# Altium PCB bdcmc25_revised.PcbDoc (part 4 of 4)
Units mil, origin at the board's own origin, x right, y up, seen from the top; angles counter-clockwise.
Board outline 7000 x 2750 mil, 4 copper layers (Top Layer, Layer 2 (GND), Layer 3 (GND), Bottom Layer), stack 23.756 mil thick; 347 components, 158 nets, 1046 pads, 1117 vias.
Unrouted connection lines stored in the file: 6.
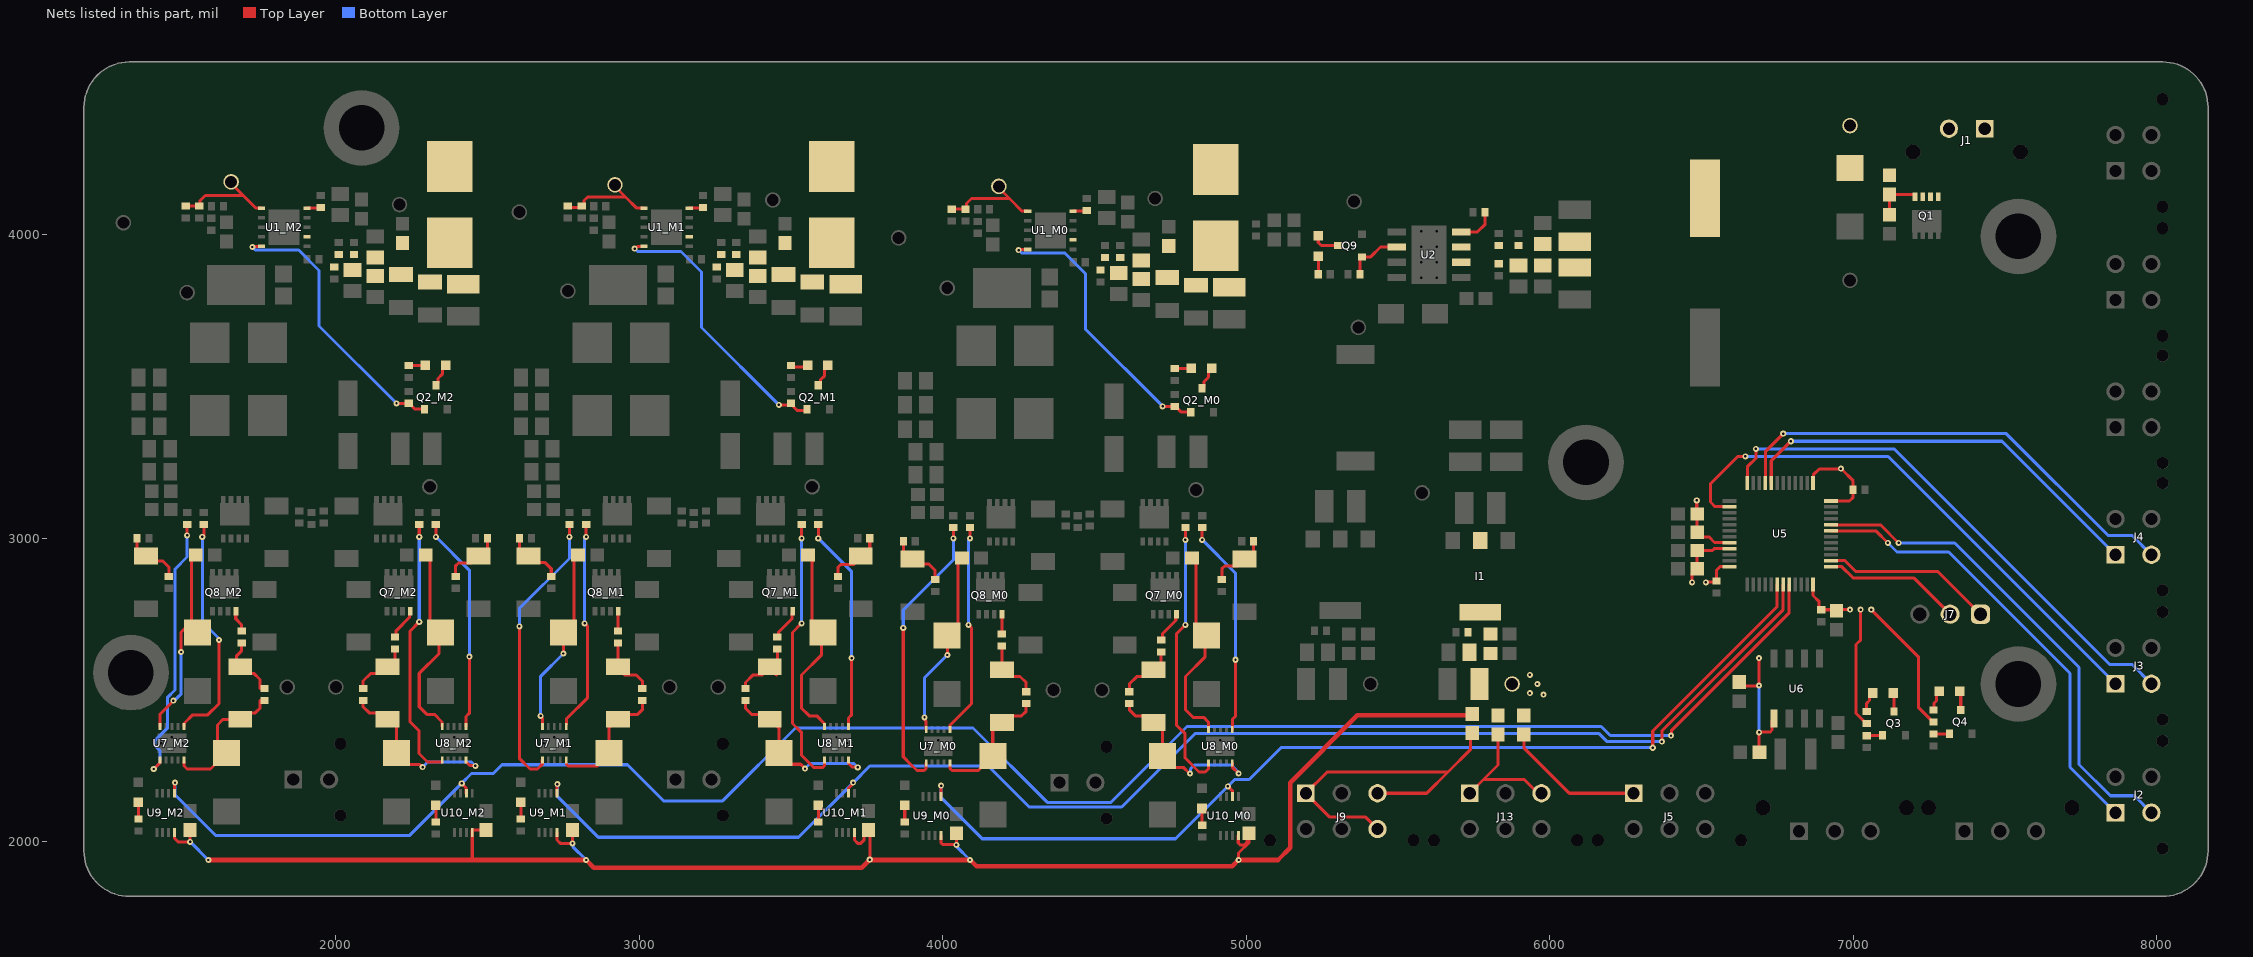
[diagram p5: the nets of this part, all layers, seen from the top]

## Via types
v1: diameter 20, hole 8, Top Layer to Bottom Layer, 1102 vias
v2: diameter 20, hole 7.87, Top Layer to Bottom Layer, 15 vias

## Nets (pads, with @x,y where several pads share a name; then routed paths per layer and width w, separated by ;. In a path a pad name is that pad's centre, name@x,y a point inside that pad or via, vN(x,y) a via of type N, cw(c..) or ccw(c..) an arc to the next point about the centre after c; other vN are vias at no path point) (continued)
NetC60_M0_2: C60_M0.2 D13_M0.1 U7_M0.5 | length 620.6
  Top Layer w10: v1(3940,2410) 3941.15,2408.85 3941.15,2401.41 3945.63,2396.93 U7_M0.5@3945.63,2370.12 ; v1(4015.26,2615.47) 4015.26,2679.86 D13_M0.1@4015,2680.12 4050,2715.12 4050,2925 4053.5,2925 C60_M0.2@4063.5,2935
  Bottom Layer w10: v1(3940,2410) 3940,2540.21 v1(4015.26,2615.47)
NetC60_M1_2: C60_M1.2 D13_M1.1 U7_M1.5 | length 617.3
  Top Layer w10: v1@2676.15,2413.85 v1(2675,2415) 2675,2413.38 2680.63,2407.75 U7_M1.5@2680.63,2380.12 ; v1(2750.26,2620.47) 2750.26,2684.86 2750,2685.12 2785,2720.12 2785,2930 2788.5,2930 C60_M1.2@2798.5,2940
  Bottom Layer w10: v1(2675,2415) 2675,2545.21 v1(2750.26,2620.47)
NetC60_M2_2: C60_M2.2 D13_M2.1 U7_M2.5 | length 618
  Top Layer w10: U7_M2.5@1420.63,2380.12 1420.63,2420.63 v1(1465,2465) ; v1(1490.26,2625.47) 1490.26,2689.86 1490,2690.12 1525,2725.12 1525,2935 1528.5,2935 C60_M2.2@1538.5,2945
  Bottom Layer w10: v1(1465,2465) 1467.71,2465 1482.52,2479.81 1483.19,2479.81 1490.26,2486.88 v1(1490.26,2625.47)
NetC61_M0_2: C61_M0.2 D14_M0.1 U8_M0.5 | length 669
  Top Layer w10: C61_M0.2@4821.5,2935 4835,2921.5 C61_M0.2@4835,2920 ; C61_M0.2@4837.48,2918.35 4835.83,2920 C61_M0.2@4835,2920 ; U8_M0.5@4875.63,2370.12 4875.63,2394.37 4860,2410 4825,2410 4800,2435 4800,2545 4865,2610 4865,2675 4870,2680 D14_M0.1@4870,2680.12 4835,2715.12 C61_M0.2@4835,2920
NetC61_M1_2: C61_M1.2 D14_M1.1 U8_M1.5 | length 663.1
  Top Layer w10: C61_M1.2@3556.5,2940 3570,2926.5 C61_M1.2@3570,2925 ; 3572.48,2923.35 3570.83,2925 C61_M1.2@3570,2925 ; U8_M1.5@3610.63,2375.12 3610.63,2381.65 3610,2382.28 3610,2390 3585,2415 3560,2415 3535,2440 3535,2550 3600,2615 3600,2680 3605,2685 3605,2685.12 3570,2720.12 C61_M1.2@3570,2925
NetC61_M2_2: C61_M2.2 D14_M2.1 U8_M2.5 | length 663.1
  Top Layer w10: C61_M2.2@2296.5,2945 2310,2931.5 C61_M2.2@2310,2930 ; C61_M2.2@2312.48,2928.35 2310.83,2930 C61_M2.2@2310,2930 ; U8_M2.5@2350.63,2380.12 2350.63,2386.65 2350,2387.28 2350,2395 2325,2420 2300,2420 2275,2445 2275,2555 2340,2620 2340,2685 2345,2690 D14_M2.1@2345,2690.12 2310,2725.12 C61_M2.2@2310,2930
NetC62_M0_2: C62_M0.2 U7_M0.6 | length 939
  Top Layer w10: v1(3870,2705) 3870,2280 3894.09,2255.91 3915,2235 3939.14,2235 3945.35,2241.21 3945.35,2259.61 U7_M0.6@3945.63,2259.88 ; v1(4035,3000) C62_M0.2@4035,3035.32
  Bottom Layer w10: v1(3870,2705) 3870,2763.63 4035,2928.63 v1(4035,3000)
NetC62_M1_2: C62_M1.2 U7_M1.6 | length 944.5
  Top Layer w10: v1(2605,2710) 2605,2275 2640,2240 2665,2240 2680.35,2255.35 2680.35,2269.61 U7_M1.6@2680.63,2269.88 ; v1(2770,3005) C62_M1.2@2770,3040.32
  Bottom Layer w10: v1(2605,2710) 2605,2768.63 2770,2933.63 v1(2770,3005)
NetC62_M2_2: C62_M2.2 U7_M2.6 | length 902.7
  Top Layer w10: v1(1400,2240) 1420.63,2260.63 U7_M2.6@1420.63,2269.88 ; v1(1510,3010) C62_M2.2@1510,3045.32
  Bottom Layer w10: v1(1400,2240) 1420,2260 1420,2301.04 1403.82,2317.22 1403.82,2332.78 1445,2373.96 1445,2475 1470,2500 1470,2898.63 1510,2938.63 v1(1510,3010)
NetC63_M0_1: C63_M0.1 U8_M0.6 | length 903.1
  Top Layer w10: v1(4800,2715) 4770,2685 4770,2385 4799.04,2355.96 4799.04,2275.96 4845,2230 4865,2230 4875.63,2240.63 U8_M0.6@4875.63,2259.88 ; v1(4800,2995) C63_M0.1@4800,3035.32
  Bottom Layer w10: v1(4800,2715) v1(4800,2995)
NetC63_M1_1: C63_M1.1 U8_M1.6 | length 893.8
  Top Layer w10: v1(3535,2720) 3505,2690 3505,2390 3534.04,2360.96 3534.04,2285.96 3575,2245 3604.77,2245 3610.63,2250.86 U8_M1.6@3610.63,2269.88 ; v1(3535,3000) C63_M1.1@3535,3040.32
  Bottom Layer w10: v1(3535,2720) v1(3535,3000)
NetC63_M2_1: C63_M2.1 U8_M2.6 | length 866.7
  Top Layer w10: v1(2275,2725) 2245,2695 2245,2395 2274.04,2365.96 2274.04,2290.96 2301.93,2263.07 U8_M2.6@2350.35,2263.07 ; v1(2275,3005) C63_M2.1@2275,3045.32
  Bottom Layer w10: v1(2275,2725) v1(2275,3005)
NetD2_M0_1: D2_M0.1 R3_M0.1 | length 55.2
  Top Layer w10: R3_M0.1@4765,3559.37 4818.75,3559.37 D2_M0.1@4819.81,3560.43
NetD2_M0_2: D2_M0.2 Q2_M0.3 | length 79.2
  Top Layer w10: Q2_M0.3@4855,3494.37 4861.81,3501.18 4861.81,3516.81 4876.06,3531.06 4876.06,3549.68 D2_M0.2@4886.81,3560.43
NetD2_M1_1: D2_M1.1 R3_M1.1 | length 55.2
  Top Layer w10: R3_M1.1@3500,3564.37 3553.75,3564.37 D2_M1.1@3554.8,3565.43
NetD2_M1_2: D2_M1.2 Q2_M1.3 | length 79.2
  Top Layer w10: Q2_M1.3@3590,3499.37 3596.81,3506.18 3596.81,3521.81 3611.06,3536.06 3611.06,3554.68 D2_M1.2@3621.8,3565.43
NetD2_M2_1: D2_M2.1 R3_M2.1 | length 55.2
  Top Layer w10: R3_M2.1@2240,3569.37 2293.75,3569.37 D2_M2.1@2294.8,3570.43
NetD2_M2_2: D2_M2.2 Q2_M2.3 | length 79.2
  Top Layer w10: Q2_M2.3@2330,3504.37 2336.81,3511.18 2336.81,3526.81 2351.06,3541.06 2351.06,3559.68 D2_M2.2@2361.8,3570.43
NetD4_1: D4.1 R18.1 | length 68.9
  Top Layer w10: R18.1@7045,2429.68 7045,2456.5 7054.06,2465.55 7054.06,2479.68 D4.1@7064.81,2490.43
NetD4_2: D4.2 Q3.3 | length 75.6
  Top Layer w10: D4.2@7122.43,2481.05 D4.2@7131.81,2490.43 7135,2487.23 Q3.3@7135,2429.37
NetD5_1: D5.1 R19.1 | length 68.9
  Top Layer w10: R19.1@7265,2434.68 7266.97,2436.65 7266.97,2456.97 7275,2465 7275,2485.62 D5.1@7284.81,2495.43
NetD5_2: D5.2 Q4.3 | length 62.4
  Top Layer w10: D5.2@7351.81,2495.43 7355,2492.23 Q4.3@7355,2434.37
NetD6_M0_1: D6_M0.1 R22_M0.2 R23_M0.1 | length 195.3
  Top Layer w10: R23_M0.1@3870.32,2990 3870.32,2954.17 3892.87,2931.61 D6_M0.1@3900,2931.61 3916.61,2915 3955,2915 3975,2895 R22_M0.2@3975,2864.68
NetD6_M1_1: D6_M1.1 R22_M1.2 R23_M1.1 | length 195.3
  Top Layer w10: R23_M1.1@2605.32,2995 2605.32,2959.17 2627.87,2936.61 2635,2936.61 2651.61,2920 2690,2920 2710,2900 R22_M1.2@2710,2869.68
NetD6_M2_1: D6_M2.1 R22_M2.2 R23_M2.1 | length 195.3
  Top Layer w10: R23_M2.1@1345.32,3000 1345.32,2964.17 1367.87,2941.61 D6_M2.1@1375,2941.61 1391.61,2925 1430,2925 1450,2905 R22_M2.2@1450,2874.68
NetD7_M0_1: D7_M0.1 R24_M0.2 R25_M0.2 | length 198.3
  Top Layer w10: R25_M0.2@4920,2864.68 4920,2900 4929.06,2909.06 4972.44,2909.06 D7_M0.1@4995,2931.61 5002.13,2931.61 5024.69,2954.17 R24_M0.2@5024.69,2990
NetD7_M1_1: D7_M1.1 R24_M1.2 R25_M1.2 | length 198.3
  Top Layer w10: R25_M1.2@3655,2869.68 3655,2905 3664.06,2914.06 3707.44,2914.06 3730,2936.61 3737.13,2936.61 3759.68,2959.17 R24_M1.2@3759.68,2995
NetD7_M2_1: D7_M2.1 R24_M2.2 R25_M2.2 | length 198.3
  Top Layer w10: R25_M2.2@2395,2874.68 2395,2910 2404.06,2919.06 2447.44,2919.06 D7_M2.1@2470,2941.61 2477.13,2941.61 2499.68,2964.17 R24_M2.2@2499.68,3000
NetD10_M0_1: D10_M0.1 R28_M0.2 R30_M0.1 | length 206.3
  Top Layer w10: R30_M0.1@4195,2645.32 D10_M0.1@4195,2566.61 4216.61,2545 4255,2545 4275,2525 R28_M0.2@4275,2494.68
NetD10_M0_2: D10_M0.2 D12_M0.2 R28_M0.1 U7_M0.10 | length 423.8
  Top Layer w10: U7_M0.10@4024.65,2253.07 4024.65,2240.86 4030.5,2235 4117.2,2235 4125.51,2243.31 4125.51,2245.28 4163.03,2282.8 D12_M0.2@4165,2282.8 4165,2370.83 4187.56,2393.39 D10_M0.2@4195,2393.39 4216.61,2415 4260,2415 4275,2430 R28_M0.1@4275,2455.32
NetD10_M1_1: D10_M1.1 R28_M1.2 R30_M1.1 | length 206.3
  Top Layer w10: R30_M1.1@2930,2650.32 2930,2571.61 2951.61,2550 2990,2550 3010,2530 R28_M1.2@3010,2499.68
NetD10_M1_2: D10_M1.2 D12_M1.2 R28_M1.1 U7_M1.10 | length 408.1
  Top Layer w10: U7_M1.10@2759.65,2258.07 2759.65,2256.13 2765.5,2250.28 2862.48,2250.28 2900,2287.8 2900,2375.83 2922.56,2398.39 2930,2398.39 2951.61,2420 2995,2420 3010,2435 R28_M1.1@3010,2460.32
NetD10_M2_1: D10_M2.1 R28_M2.2 R30_M2.1 | length 214.5
  Top Layer w10: R30_M2.1@1690,2655.32 1690,2630 1673.32,2613.32 1673.32,2579.93 1670,2576.61 1691.61,2555 1730,2555 1750,2535 1750,2504.68
NetD10_M2_2: D10_M2.2 D12_M2.2 R28_M2.1 U7_M2.10 | length 473.1
  Top Layer w10: U7_M2.10@1499.65,2263.07 1499.65,2250.35 1510,2240 1587.2,2240 1600.51,2253.31 1600.51,2255.28 1638.03,2292.8 D12_M2.2@1640,2292.8 1610,2322.8 1610,2385 1628.39,2403.39 1670,2403.39 1691.61,2425 1735,2425 1750,2440 1750,2465.32
NetD11_M0_1: D11_M0.1 R29_M0.2 R31_M0.2 | length 225.7
  Top Layer w10: R29_M0.2@4615,2494.68 4615,2520 4639.06,2544.06 4669.06,2544.06 4675,2550 4678.39,2550 D11_M0.1@4695,2566.61 ; D11_M0.1@4716.61,2545 D11_M0.1@4695,2566.61 ; R31_M0.2@4720,2625.32 4720,2589.17 4697.44,2566.61 D11_M0.1@4695,2566.61
NetD11_M0_2: D11_M0.2 D15_M0.2 R29_M0.1 U8_M0.10 | length 563.2
  Top Layer w10: R29_M0.1@4615,2455.32 4615,2435 4635,2415 4673.39,2415 D11_M0.2@4695,2393.39 D11_M0.2@4702.44,2393.39 ; D11_M0.2@4725,2370.83 D15_M0.2@4725,2282.8 4762.52,2245.28 4792.85,2245.28 4813.12,2225 v1(4815,2225) ; U8_M0.10@4954.37,2259.88 4954.37,2245.63 v1(4975,2225)
  Bottom Layer w10: v1(4815,2225) 4816.91,2226.91 4816.91,2240.49 4829.43,2253 4949.83,2253 4962.27,2240.56 4962.27,2240.43 4975,2227.71 v1(4975,2225)
NetD11_M1_1: D11_M1.1 R29_M1.2 R31_M1.2 | length 225.7
  Top Layer w10: R29_M1.2@3350,2499.68 3350,2525 3374.06,2549.06 3404.06,2549.06 3410,2555 3413.39,2555 D11_M1.1@3430,2571.61 ; D11_M1.1@3451.61,2550 D11_M1.1@3430,2571.61 ; R31_M1.2@3455,2630.32 3455,2594.17 3432.44,2571.61 D11_M1.1@3430,2571.61
NetD11_M1_2: D11_M1.2 D15_M1.2 R29_M1.1 U8_M1.10 | length 569.4
  Top Layer w10: R29_M1.1@3350,2460.32 3350,2440 3370,2420 3408.39,2420 3430,2398.39 3437.44,2398.39 3460,2375.83 D15_M1.2@3460,2292.8 3497.27,2255.52 3531.97,2255.52 v1(3546.25,2241.25) ; U8_M1.10@3689.65,2258.07 3701.57,2246.15 3718.85,2246.15 v1(3720,2245)
  Bottom Layer w10: v1(3546.25,2241.25) 3563,2258 3707,2258 v1(3720,2245)
NetD11_M2_1: D11_M2.1 R29_M2.2 R31_M2.2 | length 225.7
  Top Layer w10: R29_M2.2@2090,2504.68 2090,2530 2114.06,2554.06 2144.06,2554.06 2150,2560 2153.39,2560 D11_M2.1@2170,2576.61 ; D11_M2.1@2191.61,2555 D11_M2.1@2170,2576.61 ; R31_M2.2@2195,2635.32 2195,2599.17 2172.44,2576.61 D11_M2.1@2170,2576.61
NetD11_M2_2: D11_M2.2 D15_M2.2 R29_M2.1 U8_M2.10 | length 572.3
  Top Layer w10: R29_M2.1@2090,2465.32 2090,2445 2110,2425 2148.39,2425 D11_M2.2@2170,2403.39 2177.44,2403.39 2200,2380.83 D15_M2.2@2200,2292.8 2237.52,2255.28 2275.59,2255.28 2284.62,2246.25 v1(2286.25,2246.25) ; U8_M2.10@2429.65,2263.07 2441.57,2251.15 2458.85,2251.15 v1(2460,2250)
  Bottom Layer w10: v1(2286.25,2246.25) 2303,2263 2447,2263 v1(2460,2250)
NetD18_M0_1: D18_M0.1 R32_M0.2 | length 55.3
  Top Layer w10: D18_M0.1@3874.57,2119.8 3875,2119.38 R32_M0.2@3875,2064.68
NetD18_M1_1: D18_M1.1 R32_M1.2 | length 55.3
  Top Layer w10: D18_M1.1@2609.57,2124.8 2610,2124.38 R32_M1.2@2610,2069.68
NetD18_M2_1: D18_M2.1 R32_M2.2 | length 55.3
  Top Layer w10: D18_M2.1@1349.58,2129.8 1350,2129.38 R32_M2.2@1350,2074.68
NetD19_M0_1: D19_M0.1 R33_M0.2 | length 55.3
  Top Layer w10: D19_M0.1@4854.57,2109.8 4855,2109.38 R33_M0.2@4855,2054.68
NetD19_M1_1: D19_M1.1 R33_M1.2 | length 55.3
  Top Layer w10: D19_M1.1@3589.57,2114.8 3590,2114.38 R33_M1.2@3590,2059.68
NetD19_M2_1: D19_M2.1 R33_M2.2 | length 55.3
  Top Layer w10: D19_M2.1@2329.57,2119.8 2330,2119.38 R33_M2.2@2330,2064.68
NetD21_1: D21.1 R34.1 | length 60.1
  Top Layer w10: D21.1@5237.16,3929.8 5237.9,3929.07 R34.1@5237.9,3870
NetD21_2: D21.2 Q9.3 | length 91.8
  Top Layer w10: D21.2@5237.16,3996.8 5237.59,3996.38 5237.59,3975 5247.59,3965 Q9.3@5303.22,3965
NetF2_2: F2.2 J5.1 | length 467.5
  Top Layer w10: F2.2@5915,2353.5 5915,2310 6065,2160 J5.1@6276.89,2160
NetF3_2: F3.2 J9.1 J9.3 J9.6 | length 1197.7
  Top Layer w10: J9.6@5433.11,2041.89 5393.99,2081.01 5275.88,2081.01 J9.1@5196.89,2160 5266.89,2230 5665,2230 ; J9.3@5433.11,2160 5595,2160 5665,2230 ; F3.2@5740,2353.5 5740,2305 5665,2230
NetF4_2: F4.2 J13.1 J13.3 | length 433.4
  Top Layer w10: J13.1@5736.89,2160 5781.89,2205 ; F4.2@5830,2345 5830,2253.11 5781.89,2205 ; J13.3@5973.11,2160 5961.72,2160 5916.72,2205 5781.89,2205
NetJ1_1: J1.1@7434.06,4350 Q1.2
NetQ1_1: Q1.1 R1.2 R2.1 | length 157.6
  Top Layer w10: R2.1@7120,4066.5 R1.2@7120,4133.5 7201.41,4133.5 7204.29,4130.63 Q1.1@7204.29,4125.47
NetQ3_1: Q3.1 R16.1 | length 56.3
  Top Layer w10: R16.1@7042.66,2352.03 R16.1@7045,2349.68 7045.47,2350.16 7097.13,2350.16 Q3.1@7097.6,2350.63
NetQ4_1: Q4.1 R17.1 | length 56.3
  Top Layer w10: R17.1@7262.66,2357.03 R17.1@7265,2354.68 7265.47,2355.16 7317.13,2355.16 Q4.1@7317.6,2355.63
NetQ7_M0_1: Q7_M0.1 R31_M0.1 | length 100.1
  Top Layer w10: R31_M0.1@4724.1,2668.78 4724.1,2685.64 4767.99,2729.54 4767.99,2746.81 Q7_M0.1@4770.71,2749.53
NetQ7_M1_1: Q7_M1.1 R31_M1.1 | length 105.9
  Top Layer w10: R31_M1.1@3455,2669.68 3459.1,2673.78 3459.1,2690.64 3502.99,2734.54 3502.99,2751.81 Q7_M1.1@3505.71,2754.53
NetQ7_M2_1: Q7_M2.1 R31_M2.1 | length 105.9
  Top Layer w10: R31_M2.1@2195,2674.68 2199.1,2678.78 2199.1,2695.64 2242.99,2739.54 2242.99,2756.81 Q7_M2.1@2245.71,2759.53
NetQ8_M0_1: Q8_M0.1 R30_M0.2 | length 65.1
  Top Layer w10: R30_M0.2@4195,2684.68 4195.36,2685.04 4195.36,2749.17 Q8_M0.1@4195.71,2749.53
NetQ8_M1_1: Q8_M1.1 R30_M1.2 | length 65.1
  Top Layer w10: R30_M1.2@2930,2689.68 2930.36,2690.04 2930.36,2754.17 Q8_M1.1@2930.71,2754.53
NetQ8_M2_1: Q8_M2.1 R30_M2.2 | length 73.1
  Top Layer w10: Q8_M2.1@1670.71,2759.53 1670.36,2759.17 1670.36,2734.64 1689.36,2715.64 1689.36,2695.32 R30_M2.2@1690,2694.68
NetR7_M0_1: FB_M0.1 R7_M0.1 R10_M0.2 U1_M0.6 | length 337.5
  Top Layer w10: R7_M0.1@4035,4084.68 R10_M0.2@4080,4084.68 ; R10_M0.2@4078.24,4091.5 4078.24,4103.24 4095,4120 4220,4120 ; FB_M0.1@4185,4160 4185,4155 4220,4120 ; U1_M0.6@4280.2,4077.99 4279.83,4078.36 4261.64,4078.36 4220,4120
NetR7_M1_1: FB_M1.1 R7_M1.1 R10_M1.2 U1_M1.6 | length 334.5
  Top Layer w10: R7_M1.1@2770,4089.68 R10_M1.2@2810,4089.68 ; R10_M1.2@2810,4094.68 2811.43,4094.68 2818.24,4101.5 2818.24,4113.24 2830,4125 2955,4125 ; FB_M1.1@2920,4165 2920,4160 2955,4125 ; U1_M1.6@3015.2,4087.99 2992.01,4087.99 2955,4125
NetR7_M2_1: FB_M2.1 R7_M2.1 R10_M2.2 U1_M2.6 | length 344.6
  Top Layer w10: R7_M2.1@1510,4094.68 R10_M2.2@1550,4094.68 R10_M2.2@1555,4094.68 ; R10_M2.2@1553.24,4101.5 1553.24,4113.24 1570,4130 1695,4130 ; FB_M2.1@1655,4175 1655,4170 1695,4130 ; U1_M2.6@1755.2,4087.99 1754.83,4088.36 1736.64,4088.36 1695,4130
NetR9_M0_2: R9_M0.2 U1_M0.5 | length 46.2
  Top Layer w10: U1_M0.5@4429.8,4077.99 4430.71,4078.9 4473.58,4078.9 R9_M0.2@4475,4080.32
NetR9_M1_2: R9_M1.2 U1_M1.5 | length 46.2
  Top Layer w10: U1_M1.5@3164.8,4087.99 3207.68,4087.99 R9_M1.2@3210,4090.32
NetR9_M2_2: R9_M2.2 U1_M2.5 | length 46.2
  Top Layer w10: U1_M2.5@1904.8,4087.99 1905.71,4088.9 1948.58,4088.9 R9_M2.2@1950,4090.32
NetR12_2: R12.2 U2.4 | length 124.2
  Top Layer w10: U2.4@5708.89,4010 5762.59,4010 5787.59,4035 5787.59,4069.68 R12.2@5787.9,4070
NetR26_M0_1: R26_M0.1 U8_M0.1 | length 715.2
  Top Layer w10: v1(4855,2995) R26_M0.1@4855,3035.32 ; U8_M0.1@4954.37,2370.12 4954.37,2402.75 4965,2413.38 v1(4965,2600)
  Bottom Layer w10: v1(4855,2995) 4965,2885 v1(4965,2600)
NetR26_M1_1: R26_M1.1 U8_M1.1 | length 715.2
  Top Layer w10: v1(3590,3000) R26_M1.1@3590,3040.32 ; U8_M1.1@3689.37,2375.12 3689.37,2407.75 3700,2418.38 v1(3700,2605)
  Bottom Layer w10: v1(3590,3000) 3700,2890 v1(3700,2605)
NetR26_M2_1: R26_M2.1 U8_M2.1 | length 715.2
  Top Layer w10: v1(2330,3005) R26_M2.1@2330,3045.32 ; U8_M2.1@2429.37,2380.12 2429.37,2412.75 2440,2423.38 v1(2440,2610)
  Bottom Layer w10: v1(2330,3005) 2440,2895 v1(2440,2610)
NetR27_M0_1: R27_M0.1 U7_M0.1 | length 700.7
  Top Layer w10: U7_M0.1@4024.37,2370.12 4024.65,2370.39 4024.65,2384.65 4095,2455 4095,2705 v1(4085,2715) ; v1(4090,3000) R27_M0.1@4090,3035.32
  Bottom Layer w10: v1(4085,2715) 4085,2993.38 4090,2998.38 v1(4090,3000)
NetR27_M1_1: R27_M1.1 U7_M1.1 | length 688.7
  Top Layer w10: U7_M1.1@2759.65,2386.93 2759.65,2404.65 2830,2475 2830,2710 v1(2820,2720) ; v1(2825,3005) R27_M1.1@2825,3040.32
  Bottom Layer w10: v1(2820,2720) 2820,2998.38 2825,3003.38 v1(2825,3005)
NetR27_M2_1: R27_M2.1 U7_M2.1 | length 767.2
  Top Layer w10: U7_M2.1@1499.37,2380.12 1499.65,2380.39 1499.65,2389.65 1528.48,2418.48 1578.48,2418.48 1615,2455 v1(1615,2665) ; v1(1560,3005) 1565,3010 R27_M2.1@1565,3045.32
  Bottom Layer w10: v1(1560,3005) 1560,2740 1560,2725 1615,2670 v1(1615,2665)
PGOOD: Q9.1 R35.1 U2.6 | length 193.2
  Top Layer w10: R35.1@5375,3866.97 5375,3920.79 5381.81,3927.6 5410.19,3927.6 5442.59,3960 U2.6@5496.29,3960 U2.6@5494.99,3961.3
PGOOD_M0: Q2_M0.1 R5_M0.1 U1_M0.10 | length 926.9
  Top Layer w10: v1(4250,3950) 4251.62,3950 4253.63,3952.01 U1_M0.10@4280.2,3952.01 ; v1(4725,3435) R5_M0.1@4765,3435 4766.97,3435 4786.34,3415.63 Q2_M0.1@4817.6,3415.63
  Bottom Layer w10: v1(4250,3950) 4260,3940 4402.53,3940 4470,3872.53 4470,3690 v1(4725,3435)
PGOOD_M1: Q2_M1.1 R5_M1.1 U1_M1.10 | length 929
  Top Layer w10: v1(2985,3955) 2986.62,3955 2993.63,3962.01 U1_M1.10@3015.2,3962.01 ; v1(3460,3440) 3501.97,3440 3521.34,3420.63 Q2_M1.1@3552.6,3420.63
  Bottom Layer w10: v1(2985,3955) 2995,3945 3137.53,3945 3205,3877.53 3205,3695 v1(3460,3440)
PGOOD_M2: Q2_M2.1 R5_M2.1 U1_M2.10 | length 926.9
  Top Layer w10: v1(1725,3960) 1726.62,3960 1728.63,3962.01 U1_M2.10@1755.2,3962.01 ; v1(2200,3445) R5_M2.1@2240,3445 2241.97,3445 2261.34,3425.63 Q2_M2.1@2292.6,3425.63
  Bottom Layer w10: v1(1725,3960) 1735,3950 1877.53,3950 1945,3882.53 1945,3700 v1(2200,3445)
PWM_IN_M0: U5.30 U9_M0.1 U10_M0.2 | length 3346.8
  Top Layer w10: U9_M0.1@3994.06,2150 3994.13,2150.08 3994.13,2184.13 v1(3995,2185) ; v1(4940.07,2182.76) 4954.37,2168.46 U10_M0.2@4954.37,2150 ; v1(6340,2310) 6340,2365 6750.16,2775.16 U5.30@6750.16,2847.68
  Bottom Layer w10: v1(3995,2185) 3995,2145 4130,2010 4767.31,2010 4962.31,2205 5010,2205 5115,2310 v1(6340,2310)
PWM_IN_M1: U5.31 U9_M1.1 U10_M1.2 | length 4765.3
  Top Layer w10: U9_M1.1@2729.06,2155 2729.13,2155.08 2729.13,2189.13 v1(2730,2190) ; U10_M1.2@3689.37,2155 U10_M1.2@3689.37,2160 3689.61,2160.24 3689.61,2176.83 3705,2192.23 v1(3705,2195) ; v1(6370,2330) 6370,2365 6769.84,2764.84 U5.31@6769.84,2847.68
  Bottom Layer w10: v1(2730,2190) 2730,2150 2865,2015 3525,2015 v1(3705,2195) 3760,2250 4150,2250 4285,2115 4590,2115 4831.42,2356.42 6163.58,2356.42 6190,2330 v1(6370,2330)
PWM_IN_M2: U5.32 U9_M2.1 U10_M2.2 | length 6222
  Top Layer w10: U9_M2.1@1469.06,2160 1469.13,2160.08 1469.13,2194.13 v1(1470,2195) ; v1(2415.07,2192.76) 2429.37,2178.46 U10_M2.2@2429.37,2160 ; v1(6400,2350) 6401.15,2351.15 6401.15,2366.15 6789.53,2754.53 U5.32@6789.53,2847.68
  Bottom Layer w10: v1(1470,2195) 1470,2155 1605,2020 2242.31,2020 v1(2415.07,2192.76) 2447.31,2225 2518.95,2225 2547.79,2253.84 2961.16,2253.84 3080,2135 3275,2135 3515,2375 4100,2375 4345,2130 4555,2130 4805,2380 6170,2380 6200,2350 v1(6400,2350)
QUAD_0_A: J2.1@7865,2095.94 U5.43 | length 1503.5
  Top Layer w10: U5.43@6927.32,3024.84 7075.16,3024.84 v1(7115,2985)
  Bottom Layer w10: v1(7115,2985) 7145,2955 7315,2955 7715,2555 7715,2245.94 J2.1@7865,2095.94
QUAD_0_B: J2.3 U5.44 | length 1636.2
  Top Layer w10: U5.44@6927.32,3044.53 7090.47,3044.53 v1(7150,2985)
  Bottom Layer w10: v1(7150,2985) 7335,2985 7745,2575 7745,2255 7848.3,2151.7 7927.35,2151.7 J2.3@7983.11,2095.94
QUAD_1_A: J3.1@7865,2520.94 U5.14 | length 1812
  Top Layer w10: U5.14@6592.68,3103.58 6591.68,3104.58 6545.42,3104.58 6530,3120 6530,3180 6620,3270 v1(6645,3270)
  Bottom Layer w10: v1(6645,3270) 7115.94,3270 J3.1@7865,2520.94
QUAD_1_B: J3.3 U5.12 | length 1748.1
  Top Layer w10: U5.12@6651.73,3182.32 6651.73,3235.47 6680,3263.73 v1(6680,3295)
  Bottom Layer w10: v1(6680,3295) 7135,3295 7845,2585 7919.05,2585 J3.3@7983.11,2520.94
QUAD_2_A: J4.1@7865,2945.94 U5.8 | length 1389.3
  Top Layer w10: U5.8@6730.47,3182.32 6730.47,3255.47 v1(6795,3320)
  Bottom Layer w10: v1(6795,3320) 7490.94,3320 J4.1@7865,2945.94
QUAD_2_B: J4.3 U5.9 | length 1565.6
  Top Layer w10: U5.9@6710.79,3182.32 6710.79,3285.79 v1(6770,3345)
  Bottom Layer w10: v1(6770,3345) 7505,3345 7840,3010 7919.05,3010 J4.3@7983.11,2945.94
SWCLK: J7.1 U5.38 | length 565.8
  Top Layer w10: U5.38@6927.32,2926.42 6973.58,2926.42 7010,2890 7280,2890 J7.1@7420,2750
SWDIO: J7.2 U5.37 | length 457.6
  Top Layer w10: U5.37@6927.32,2906.73 6963.27,2906.73 7000,2870 7200,2870 J7.2@7320,2750
VBAT: C1.2 C2.2 C3.2 C4.2 C5.2 C6.2 C7.2 C8.2 C33.2 D1.1 F1_M0.1 F1_M1.1 F1_M2.1 J1.2 R1.1 U2.2 U2.3 VBAT.1
VBAT_FUSED: C9_M0.2 C9_M1.2 C9_M2.2 C10_M0.2 C10_M1.2 C10_M2.2 C11_M0.2 C11_M1.2 C11_M2.2 C12_M0.2 C12_M1.2 C12_M2.2 C13_M0.2 C13_M1.2 C13_M2.2 C14_M0.2 C14_M1.2 C14_M2.2 C15_M0.2 C15_M1.2 C15_M2.2 C24_M0.2 C24_M1.2 C24_M2.2 C25_M0.2 C25_M1.2 C25_M2.2 F1_M0.2 F1_M1.2 F1_M2.2 R4_M0.2 R4_M1.2 R4_M2.2 U1_M0.2 U1_M1.2 U1_M2.2
VBAT_MCU: 3V3.1 C31.2 C32.2 C34.2 C35.2 C44.2 C48.2 C49.2 C50.2 C51.2 C52.2 C53.2 C54.2 C55.2 C64_M0.1 C64_M1.1 C64_M2.1 C65_M0.1 C65_M1.1 C65_M2.1 F2.1 F3.1 F4.1 I1.2 I1.4 R14.1 R15.1 R18.2 R19.2 U5.1 U5.20 U5.21 U5.24 U5.36 U5.48 U6.5 U9_M0.8 U9_M1.8 U9_M2.8 U10_M0.8 U10_M1.8 U10_M2.8 | length 8023.3
  Top Layer w10: U9_M2.8@1469.06,2030.08 1469.13,2030 1469.13,2010.86 1479.99,2000 v1(1520,2000) C64_M2.1@1520,2038.5 ; 2449.37,1940 2449.68,1940.32 ; 2450,1940 2449.68,1940.32 ; C65_M2.1@2485,2027.52 C65_M2.1@2490,2027.52 ; C65_M2.1@2495,2038.5 2449.76,2038.5 2449.68,2038.43 U10_M2.8@2449.68,2030 2449.68,1940.32 ; U9_M1.8@2729.06,2030.08 2729.06,2005.94 2740,1995 v1(2780,1995) C64_M1.1@2780,2033.5 ; U10_M1.8@3709.06,2030.08 3709.13,2030 3709.13,2005.87 3720,1995 3730,1995 3740,2005 3740,2023.5 C65_M1.1@3755,2038.5 ; C65_M1.1@3758.35,2022.52 3760,2020.87 v1@3760,1941.04 ; U9_M0.8@3994.06,2020.08 3994.06,1997.01 3999.91,1991.15 4043.85,1991.15 v1(4045,1990) C64_M0.1@4045,2028.5 ; U10_M0.8@4974.06,2020.08 4974.06,1995.94 4980,1990 4995,1990 5003.35,1998.35 5003.35,2011.85 C65_M0.1@5008.79,2017.3 ; 4985,1940 v1(4975,1940) 4975,1962.93 5008.79,1996.72 C65_M0.1@5008.79,2017.3 ; C65_M0.1@5008.79,2027.3 C65_M0.1@5008.79,2017.3 ; C65_M0.1@5020,2028.5 C65_M0.1@5008.79,2017.3 ; v1(6470,2855) 6470,2883.5 C55.2@6486.5,2900 C54.2@6486.5,2960 6536.76,2960 6542.55,2965.79 U5.21@6592.68,2965.79 ; v1(6485,3125) 6485,3081.5 C53.2@6486.5,3080 C52.2@6486.5,3020 6501.5,3005 6525,3005 6543.53,2986.47 6591.68,2986.47 U5.20@6592.68,2985.47 ; v1(6515,2855) 6516.15,2856.15 6546.46,2856.15 C49.2@6550,2859.68 6550,2895 6561.73,2906.73 U5.24@6592.68,2906.73 ; R14.1@6625,2526.5 6638.56,2512.94 6686.32,2512.94 6688.38,2515 v1(6690,2515) v1(6690,2605) ; R15.1@6691.5,2295 6690,2296.5 6690,2360 v1(6690.82,2360.82) 6691.15,2361.15 6726.15,2361.15 6733.19,2368.19 6733.19,2399.76 U6.5@6740,2406.57 ; U5.1@6868.27,3182.32 6869.27,3183.32 6869.27,3209.27 6888.85,3228.85 6958.85,3228.85 v1(6960,3230) ; U5.36@6869.13,2846.81 U5.36@6868.27,2847.68 6868.27,2811.73 6888.5,2791.5 6888.5,2771.18 C50.2@6895,2764.68 6941.81,2764.68 6942.13,2765 v1(6990,2765) ; U5.48@6927.32,3123.27 6988.27,3123.27 7000.31,3135.32 C48.2@7000.31,3160 7000.31,3189.68 v1(6960,3230) ; v1@6960.57,3230.57 v1(6960,3230) ; v1(7025,2765) 7025,2665 7010,2650 7010,2423.35 7043.03,2390.32 R18.2@7045,2390.32 ; v1(7060,2765) 7215,2610 7215,2443.35 7263.03,2395.32 R19.2@7265,2395.32
  Top Layer w15: v1(1580,1940) 2449.37,1940 ; 2450,1940 v1(2825,1940) 2850,1915 3733.53,1915 v1(3759.56,1941.04) ; v1@3760,1940 v1(4090,1940) 4091.35,1940 4111.35,1920 4953.65,1920 4973.65,1940 v1(4975,1940) ; 4985,1940 5105,1940 5145,1980 5145,2195 5366.5,2416.5 F3.1@5740,2416.5
  Bottom Layer w10: v1(1520,2000) v1(1580,1940) ; v1(2780,1995) 2781.15,1993.85 2781.15,1983.85 v1(2825,1940) ; v1(4045,1990) 4046.15,1988.85 4046.15,1983.85 v1(4090,1940) ; v1(6470,2855) v1@6470,2856.62 ; v1(6690,2515) 6690.41,2514.59 6690.41,2361.23 v1(6690.82,2360.82)
  other v1: 5980,2485 5935,2490 5960,2520 5935,2550
pads on no net: GND.1@2605,4075 GND.1@3855,3990 J1.1@7197.83,4272.83 J1.1@7552.17,4272.83 J2.1@8020.12,1977.83 J2.1@8020.12,2332.17 J3.1@8020.12,2402.83 J3.1@8020.12,2757.17 J4.1@8020.12,2827.83 J4.1@8020.12,3182.17 J5. J6.1@8020.12,3247.83 J6.1@8020.12,3602.17 J9. J10.1@8020.12,3667.83 J10.1@8020.12,4022.17 J12.1@8020.12,4092.83 J12.1@8020.12,4447.17 J13. J14.1 J14_M0.1@4540.12,2076.89 J14_M0.1@4540.12,2313.11 J14_M1.1@3275.12,2086.89 J14_M1.1@3275.12,2323.11 J14_M2.1@2015.12,2086.89 J14_M2.1@2015.12,2323.11 J15.1 U5.6 U5.7 U5.10 U5.11 U5.13 U5.15 U5.16 U5.17 U5.18 U5.22 U7_M0.2 U7_M1.2 U7_M2.2 U8_M0.2 U8_M1.2 U8_M2.2 U9_M0.3 U9_M1.3 U9_M2.3 U10_M0.3 U10_M1.3 U10_M2.3

## Polygon pours and split planes (outlines as drawn)
GND on Top Layer "GND_L01_P046" (solid, remove dead copper, pour order 46): 1170,1970 1170,4420 cw(c1320,4420) 1320,4570 8020,4570 cw(c8020,4420) 8170,4420 8170,1970 cw(c8020,1970) 8020,1820 1320,1820 cw(c1320,1970)
NetC23_M2_2 on Top Layer "Polygon_Connect_1" (solid, remove dead copper, pour order 3): 1505,3710 1460,3755 1460,3860 1515,3915 1640,3915 1675,3950 1675,3985 1695,4005 1765,4005 1770,4000 1770,3985 1765,3980 1720,3980 1705,3965 1705,3950 1735,3920 1765,3920 1790,3895 1790,3755 1815,3730 1835,3730 1855,3710 1855,3580 1840,3565 1520,3565 1505,3580
NetC23_M1_2 on Top Layer "Polygon_Connect_1" (solid, remove dead copper, pour order 23): 2765,3705 2710,3760 2710,3875 2735,3900 2825,3900 2835,3910 2900,3910 2935,3945 2935,3980 2955,4000 3025,4000 3030,3995 3030,3980 3025,3975 2980,3975 2965,3960 2965,3945 2995,3915 3025,3915 3050,3890 3050,3750 3075,3725 3095,3725 3115,3705 3115,3575 3100,3560 2780,3560 2765,3575
12V_MOTOR_M1 on Top Layer "Polygon_Connect_1" (solid, remove dead copper, pour order 25): 3630,3195 3595,3230 3540,3230 3525,3245 3525,3335 3500,3360 3275,3360 3110,3525 2765,3525 2720,3570 2655,3570 2640,3555 2640,3335 2650,3325 2670,3325 2685,3310 2685,3070 2695,3060 2840,3060 2865,3035 2990,3035 3020,3065 3155,3065 3160,3060 3200,3060 3205,3065 3335,3065 3365,3035 3500,3035 3500,3050 3510,3060 3610,3060 3630,3080
NetC30_2 on Top Layer "Polygon_Connect_1" (solid, remove dead copper, pour order 31): 5290,3729.57 5370.21,3809.78 5446.29,3883.71 5447.59,3885 5522.59,3885 5537.59,3870 5537.59,3850 5522.59,3835 5472.59,3835 5471.29,3833.71 5468.71,3833.71 5435,3800 5440,3795 5440,3770 5525,3770 5525,3710 5440,3710 5430,3700 5430,3575 5420,3565 5415,3570 5295,3570 5290,3575
VBAT_MCU on Top Layer "Polygon_Connect_1" (solid, remove dead copper, pour order 35): 5719.86,2385.14 5689.86,2385.14 5675,2400 5675,2430 5715,2470 5715,2580 5705,2590 5705,2660 5710,2665 5710,2710 5690,2730 5690,2795 5735,2840 5735,3020 5750,3035 5795,3035 5810,3020 5810,2840 5865,2785 5865,2740 5835,2710 5835,2595 5855,2575 5940,2575 6000,2515 6000,2445 5995,2445 5935,2385 5720,2385
7V_Buck on Top Layer "Polygon_Connect_1" (solid, remove dead copper, pour order 34): 5100,3340 5085,3340 5070,3325 5070,3057.5 5185,2942.5 5230,2942.5 5245,2957.5 5245,3012.5 5295,3062.5 5295,3162.5 5325,3192.5 5500,3192.5 5520,3172.5 5520,3122.5 5550,3092.5 5595,3092.5 5625,3062.5 5625,2957.5 5645,2937.5 5695,2937.5 5710,2952.5 5710,3012.5 5750,3052.5 5750,3162.5 5780,3192.5 5910,3192.5 5925,3207.5 5925,3282.5 5910,3297.5 5572.5,3297.5 5565,3290 5150,3290
M-_M0 on Top Layer "Polygon_Connect_1" (solid, remove dead copper, pour order 2): 2067.04,2978.26 2110.94,3022.16 2192.84,3022.16 2192.84,2977.16 2205,2965 2260,2965 2265,2960 2265,2806.22 2252.04,2793.26 2112.04,2793.26 2017.04,2698.26 2017.04,2573.26 2047.04,2543.26 2047.04,2432.04 2027.04,2410 2027.04,2173.26 2007.04,2153.26 1947.04,2153.26 1927.04,2173.26 1927.04,2918.26 1987.04,2978.26
12V_MOTOR_M2 on Top Layer "Polygon_Connect_1" (solid, remove dead copper, pour order 5): 2240,3055 2239.54,3055 2224.54,3040 2105,3040 2075,3070 1945,3070 1940,3065 1900,3065 1895,3070 1760,3070 1730,3040 1605,3040 1580,3065 1435,3065 1425,3075 1425,3315 1410,3330 1390,3330 1380,3340 1380,3560 1395,3575 1460,3575 1505,3530 1850,3530 2015,3365 2240,3365 2265,3340 2265,3235 2285,3215 2330,3215 2370,3175 2370,3085 2350,3065 2250,3065
M+_M0 on Top Layer "Polygon_Connect_1" (solid, remove dead copper, pour order 21): 2942.5,3017.5 2940,3015 2870,3015 2830,2975 2830,2800 2845,2785 2985,2785 3080,2690 3080,2565 3050,2535 3050,2425 3070,2405 3070,2165 3090,2145 3150,2145 3170,2165 3170,2910 3110,2970 3030,2970 3000,2940 2975,2940 2950,2960 2950,3010
M-_M0 on Top Layer "Polygon_Connect_1" (solid, remove dead copper, pour order 22): 3455,2974.33 3464.33,2965 3515,2965 3525,2955 3525,2801.22 3512.04,2788.26 3372.04,2788.26 3277.04,2693.26 3277.04,2568.26 3307.04,2538.26 3307.04,2427.04 3287.04,2405 3287.04,2168.26 3267.04,2148.26 3207.04,2148.26 3187.04,2168.26 3187.04,2913.26 3247.04,2973.26 3327.04,2973.26 3373.78,3020 3455,3020
VBAT_FUSED on Top Layer "Polygon_Connect_1" (solid, remove dead copper, pour order 24): 3155,4000 3150,3995 3150,3980 3155,3975 3190,3975 3230,3935 3230,3880 3240,3870 3270,3870 3280,3860 3280,3850 3285,3845 3345,3845 3350,3840 3350,3830 3355,3825 3500,3825 3540,3785 3735,3785 3755,3805 3755,3880 3730,3905 3730,4055 3710,4075 3560,4075 3530,4045 3530,4010 3520,4000 3450,4000 3435,3985 3435,3965 3420,3950 3245,3950 3195,4000
M+_M0 on Top Layer "Polygon_Connect_1" (solid, remove dead copper, pour order 26): 4207.5,3012.5 4137.5,3012.5 4095,2970 4095,2795 4110,2780 4250,2780 4345,2685 4345,2560 4315,2530 4315,2420 4335,2400 4335,2160 4355,2140 4415,2140 4435,2160 4435,2905 4375,2965 4295,2965 4265,2935 4240,2935 4215,2955 4215,3005
M-_M0 on Top Layer "Polygon_Connect_1" (solid, remove dead copper, pour order 27): 4717.84,3012.16 4637.16,3012.16 4634.39,3010.61 4592.04,2968.26 4512.04,2968.26 4452.04,2908.26 4452.04,2163.26 4472.04,2143.26 4532.04,2143.26 4552.04,2163.26 4552.04,2400 4572.04,2422.04 4572.04,2533.26 4542.04,2563.26 4542.04,2688.26 4637.04,2783.26 4777.04,2783.26 4790,2796.22 4790,2950 4785,2955 4730,2955 4717.84,2967.16
12V_MOTOR_M0 on Top Layer "Polygon_Connect_1" (solid, remove dead copper, pour order 30): 4895,3180 4860,3215 4810,3215 4790,3235 4790,3330 4765,3355 4540,3355 4375,3520 4030,3520 3985,3565 3920,3565 3905,3550 3905,3330 3915,3320 3935,3320 3950,3305 3950,3065 3960,3055 4120,3055 4145,3030 4240,3030 4270,3060 4420,3060 4425,3055 4465,3055 4470,3060 4620,3060 4650,3030 4745,3030 4770,3055 4875,3055 4895,3075
VBAT on Top Layer "Polygon_Connect_1" (solid, remove dead copper, pour order 33): 5940,4005 5920,3985 5760,3985 5755,3980 5685,3980 5675,3970 5675,3895 5685,3885 5860,3885 5880,3865 6020,3865 6045,3840 6500,3840 6825,4165 7150,4165 7160,4175 7160,4300 7167.5,4307.5 7332.5,4307.5 7365,4340 7365,4440 7325,4480 2330,4480 2245,4395 2245,4140 2275,4110 2450,4110 2482.5,4142.5 2482.5,4232.5 2510,4260 3490,4260 3520,4230 3520,4140 3545,4115 3725,4115 3747.5,4137.5 3747.5,4232.5 3775,4260 4760,4260 4790,4230 4790,4125 4820,4095 4980,4095 5010,4125 5010,4230 5040,4260 6360,4260 6420,4200 6420,4090 6355,4025 6030,4025 6010,4005
5V on Top Layer "Polygon_Connect_1" (solid, remove dead copper, pour order 36): 5270,2400 5265,2395 5220,2395 5205,2410 5205,2440 5220,2455 5230,2455 5245,2470 5245,2580 5235,2590 5235,2665 5245,2675 5245,2715 5225,2735 5225,2795 5270,2840 5270,3025 5285,3040 5335,3040 5350,3025 5350,2840 5395,2795 5395,2725 5370,2700 5370,2590 5385,2575 5435,2575 5465,2545 5465,2475 5435,2445 5315,2445
NetJ1_1 on Top Layer "Polygon_Connect_1" (solid, remove dead copper, pour order 43): 7220,4110 7225,4105 7290,4105 7295,4110 7485,4305 7485,4380 7460,4405 7410,4405 7385,4380 7385,4310 7220,4145 7220,4115
VBAT_FUSED on Top Layer "Polygon_Connect_1" (solid, remove dead copper, pour order 29): 4420,3995 4415,3990 4415,3975 4420,3970 4455,3970 4495,3930 4495,3875 4505,3865 4535,3865 4545,3855 4545,3845 4550,3840 4610,3840 4615,3835 4615,3825 4620,3820 4765,3820 4805,3780 5000,3780 5020,3800 5020,3875 4995,3900 4995,4050 4975,4070 4825,4070 4795,4040 4795,4005 4785,3995 4715,3995 4700,3980 4700,3960 4685,3945 4510,3945 4460,3995
NetC23_M0_2 on Top Layer "Polygon_Connect_1" (solid, remove dead copper, pour order 28): 4010,3905 3965,3860 3965,3765 4030,3700 4030,3570 4045,3555 4365,3555 4380,3570 4380,3700 4360,3720 4340,3720 4315,3745 4315,3885 4290,3910 4260,3910 4230,3940 4230,3955 4245,3970 4290,3970 4295,3975 4295,3990 4290,3995 4220,3995 4200,3975 4200,3940 4165,3905
VBAT_FUSED on Top Layer "Polygon_Connect_1" (solid, remove dead copper, pour order 4): 1895,4005 1890,4000 1890,3985 1895,3980 1930,3980 1970,3940 1970,3885 1980,3875 2010,3875 2020,3865 2020,3855 2025,3850 2085,3850 2090,3845 2090,3835 2095,3830 2240,3830 2280,3790 2475,3790 2495,3810 2495,3885 2470,3910 2470,4060 2450,4080 2300,4080 2270,4050 2270,4015 2260,4005 2190,4005 2175,3990 2175,3970 2160,3955 1985,3955 1935,4005
M+_M0 on Top Layer "Polygon_Connect_1" (solid, remove dead copper, pour order 0): 1680,3025 1615,3025 1570,2980 1570,2805 1585,2790 1725,2790 1820,2695 1820,2570 1790,2540 1790,2430 1810,2410 1810,2170 1830,2150 1890,2150 1910,2170 1910,2915 1850,2975 1770,2975 1740,2945 1715,2945 1690,2965 1690,3015
GND on Bottom Layer "GND_L04_P049" (solid, remove dead copper, pour order 49): 1170,1970 1170,4420 cw(c1320,4420) 1320,4570 8020,4570 cw(c8020,4420) 8170,4420 8170,1970 cw(c8020,1970) 8020,1820 1320,1820 cw(c1320,1970)
5V on Bottom Layer "5V_L04_P045" (solid, remove dead copper, pour order 45): 5465,2475 5465,2545 5435,2575 5385,2575 5300,2490 5185,2490 5145,2450 5145,2425 5165,2405 5340,2405 5365,2430 5420,2430
VBAT_MCU on Bottom Layer "VBAT_MCU_L04_P044" (solid, remove dead copper, pour order 44): 6567.5,2792.5 6535,2825 6535,2865 6520,2880 6520,3145 6580,3205 6980,3205 6995,3220 6995,3245 6985,3255 6525,3255 6417.5,3147.5 6417.5,2887.5 6312.5,2782.5 6207.5,2782.5 6120,2780 5915,2575 5915,2480 5940,2455 6005,2455 6215,2665 6555,2665 6630,2590 6700,2590 6766.71,2656.71 6766.71,2716.71 6830,2780 6920,2780 6970,2730 7055,2730 7075.82,2750 7075.82,2799.18 7050,2825 6655,2825 6622.5,2792.5
GND on Layer 2 (GND) "GND_L02_P047" (solid, remove dead copper, pour order 47): 1170,1970 1170,4420 cw(c1320,4420) 1320,4570 8020,4570 cw(c8020,4420) 8170,4420 8170,1970 cw(c8020,1970) 8020,1820 1320,1820 cw(c1320,1970)
GND on Layer 3 (GND) "GND_L03_P048" (solid, remove dead copper, pour order 48): 1170,1970 1170,4420 cw(c1320,4420) 1320,4570 8020,4570 cw(c8020,4420) 8170,4420 8170,1970 cw(c8020,1970) 8020,1820 1320,1820 cw(c1320,1970)

## Silkscreen, mask and mechanical layers (free items; w line width, h text height)
Top Overlay:
  lines w10: 1750,2355 2115,2355 ; 3010,2355 3375,2355 ; 4275,2345 4640,2345 ; 5585,1910 5585,2320 6125,2320 6125,1910 ; 5585,2260 5585,2335 5050,2335 5050,2260 ; 6125,2260 6125,2335 6580,2335 ; 6583.8,2259.37 6583.8,2334.37 ; 6675,2135 7685,2135 ; 6675,2220 7210,2220 ; 7210,1910 7210,2220 ; 7680,2220 7210,2220 ; 7685,2410 7765,2410 ; 7685,2795 8115,2795 ; 7685,3635 8115,3635 ; 7685,4060 8115,4060 ; 7687.5,3212.5 8115,3212.5 ; 7765,2135 7685,2135 ; 7765,2370 8115,2370 ; 7765,4475 7765,1950 ; 5050,2260 5050,1910 6675,1910 ; 5050,2260 6675,2260 6675,1910 ; 6675,1910 7765,1910 7765,1950 ; 7160,4240 7590,4240 ; 7160,4240 7160,4170 7590,4170 7590,4240 ; 7160,4240 7160,4475 7570,4475 7590,4475 7590,4240 ; 7685,2135 7685,4475 8115,4475 8115,1950 7765,1950 ; 1750,2055 2115,2055 2115,2425 1750,2425 1750,2055 ; 3010,2055 3010,2425 3375,2425 3375,2055 3010,2055 ; 4275,2045 4275,2415 4640,2415 4640,2045 4275,2045
  text "+VBAT-" at 7261.7,4185.01 h40
  text "LIM_2" at 7743.36,4134.87 h40 r90
  text "LIM_1" at 7741.66,3761.69 h40 r90
  text "LIM_0" at 7746.66,3340.03 h40 r90
  text "LIM_A GND" at 7613.62,3318.09 h30 r90
  text "LIM_B GND" at 7662.5,3317.54 h30 r90
  text "QUAD_2" at 7746.66,2881.7 h40 r90
  text "QUAD_B 5V" at 7662.5,2870.04 h30 r90
  text "QUAD_A GND" at 7613.61,2855.59 h30 r90
  text "SWCLK" at 7436.48,2825.98 h30 r90
  text "GND" at 7235,2825.01 h30 r90
  text "SWDIO" at 7335,2822.52 h30 r90
  text "TX" at 7070.01,2545 h30
  text "RX" at 7285.01,2545 h30
  text "+" at 3139.24,2490.52 h40
  text "-" at 3184.24,2490.52 h40
  text "+" at 1886.67,2490.01 h40
  text "-" at 1931.67,2490.01 h40
  text "+" at 4409.24,2480.52 h40
  text "-" at 4454.24,2480.52 h40
  text "QUAD_1" at 7741.66,2458.37 h40 r90
  text "GND" at 6500.01,2400 h30
  text "3V3 SDA 3V3" at 5155.05,2390 h30
  text "3V3" at 6010.01,2385 h30
  text "+ M2 -" at 1817.1,2370.01 h40
  text "+ M1 -" at 3075.04,2370.01 h40
  text "+ M0 -" at 4337.1,2360.01 h40
  text "GND" at 6500.01,2355 h30
  text "GND SCL 3V3" at 5155.05,2350 h30
  text "GND" at 6010.01,2340 h30
  text "ABS_0" at 5226.7,2278.34 h40
  text "ABS_2" at 6291.7,2278.34 h40
  text "ABS_1" at 5768.36,2268.34 h40
  text "CANH CANL GND" at 7260.06,2235 h30
  text "QUAD_0" at 7741.66,2166.7 h40 r90
  text "CAN_0" at 6835.34,2159.75 h40
  text "CAN_1" at 7348.36,2158.34 h40
Bottom Overlay:
  drawing of 2624 lines, arcs and shapes, not listed
  text "JD NV" at 7275,3065 h100
Mechanical 1:
  the board outline again, w10